# Altium PCB BLE_product-v1.2.PcbDoc (part 1 of 2)
Units mil, origin at the board's own origin, x right, y up, seen from the top; angles counter-clockwise.
Board outline 629.8 x 648.96 mil, 4 copper layers (Top Layer, Layer 2, Layer 3, Bottom Layer), stack 39.334 mil thick; 45 components, 32 nets, 192 pads, 79 vias.
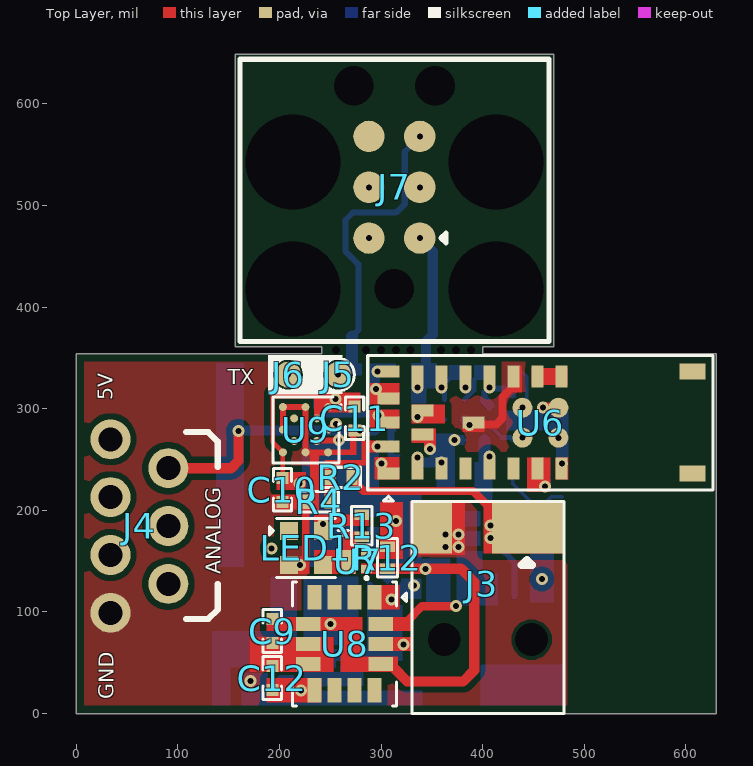
[diagram p0: Top Layer view]
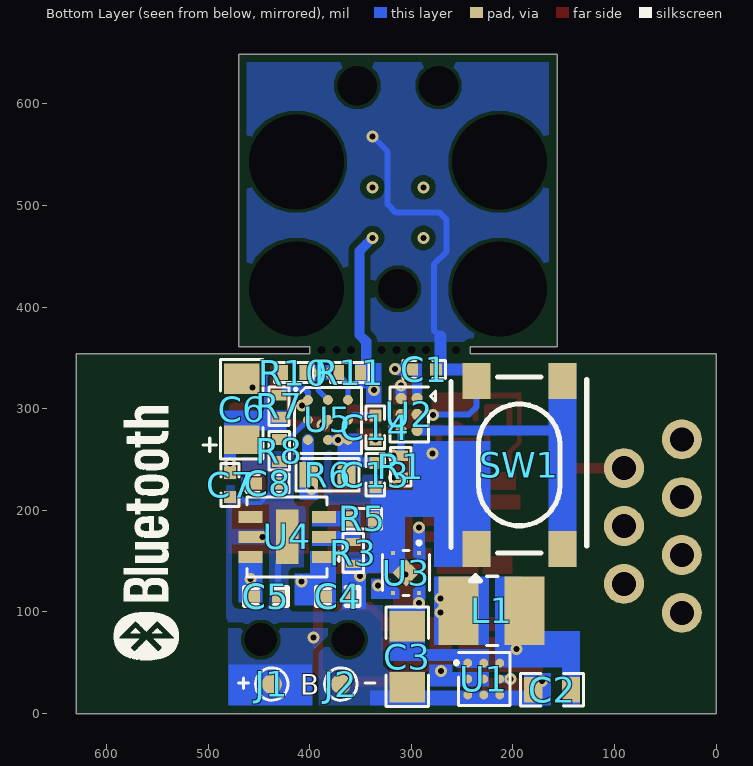
[diagram p1: Bottom Layer view, seen from below]
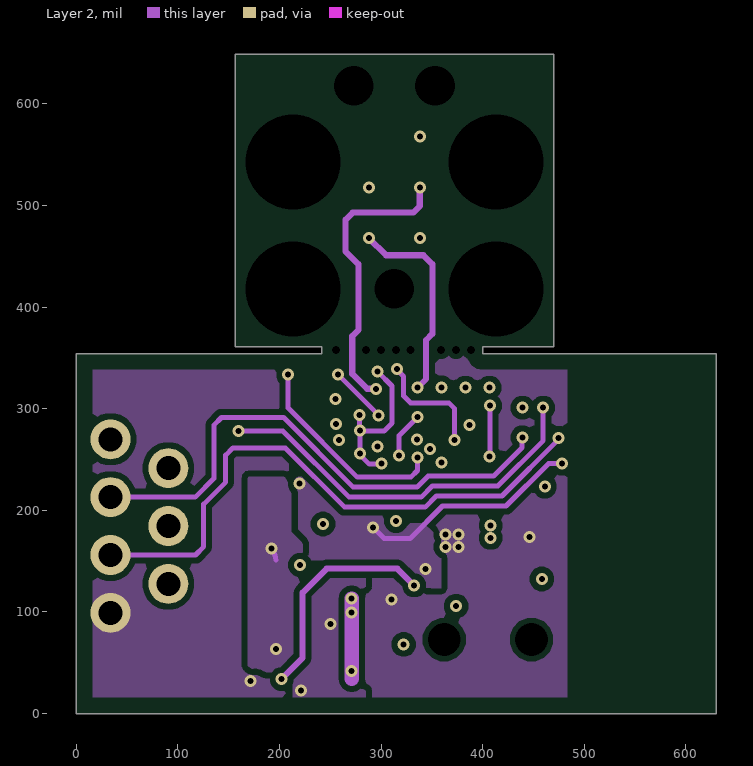
[diagram p2: Layer 2]
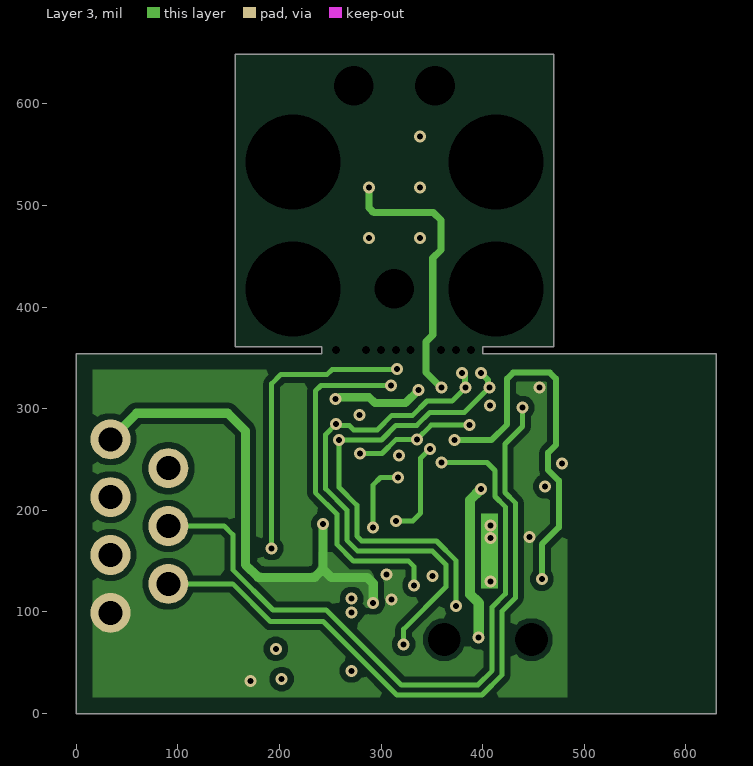
[diagram p3: Layer 3]
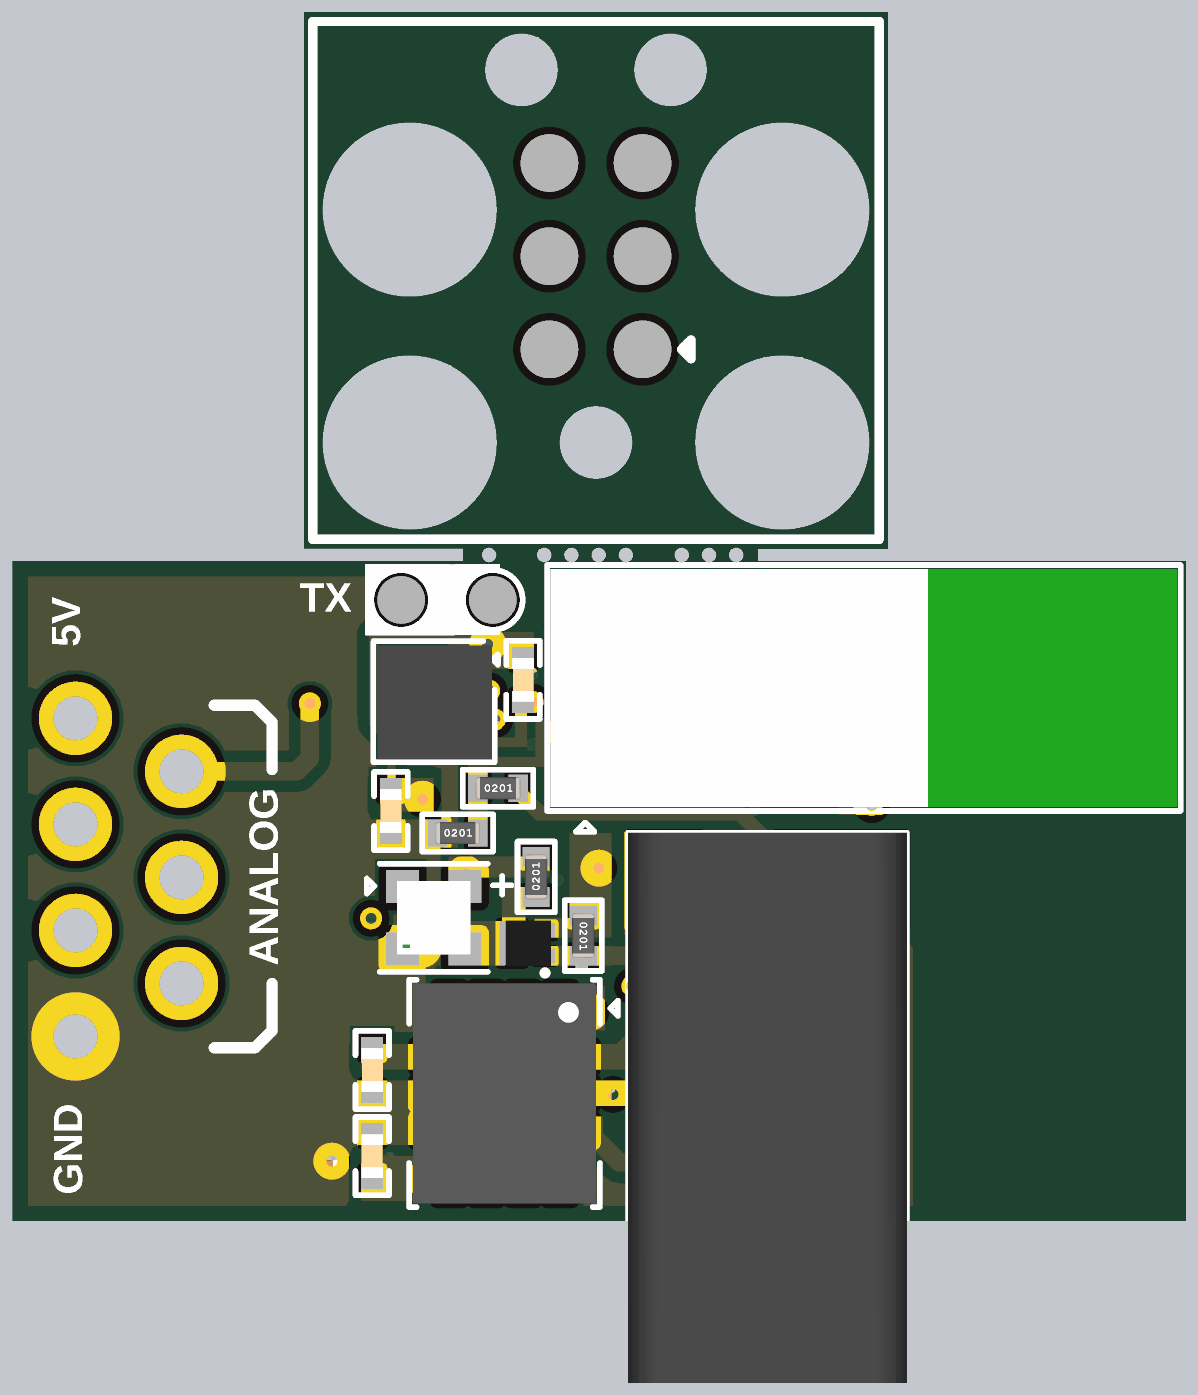
[diagram p4: 3D render of the assembled board from above, using the file's embedded part models]
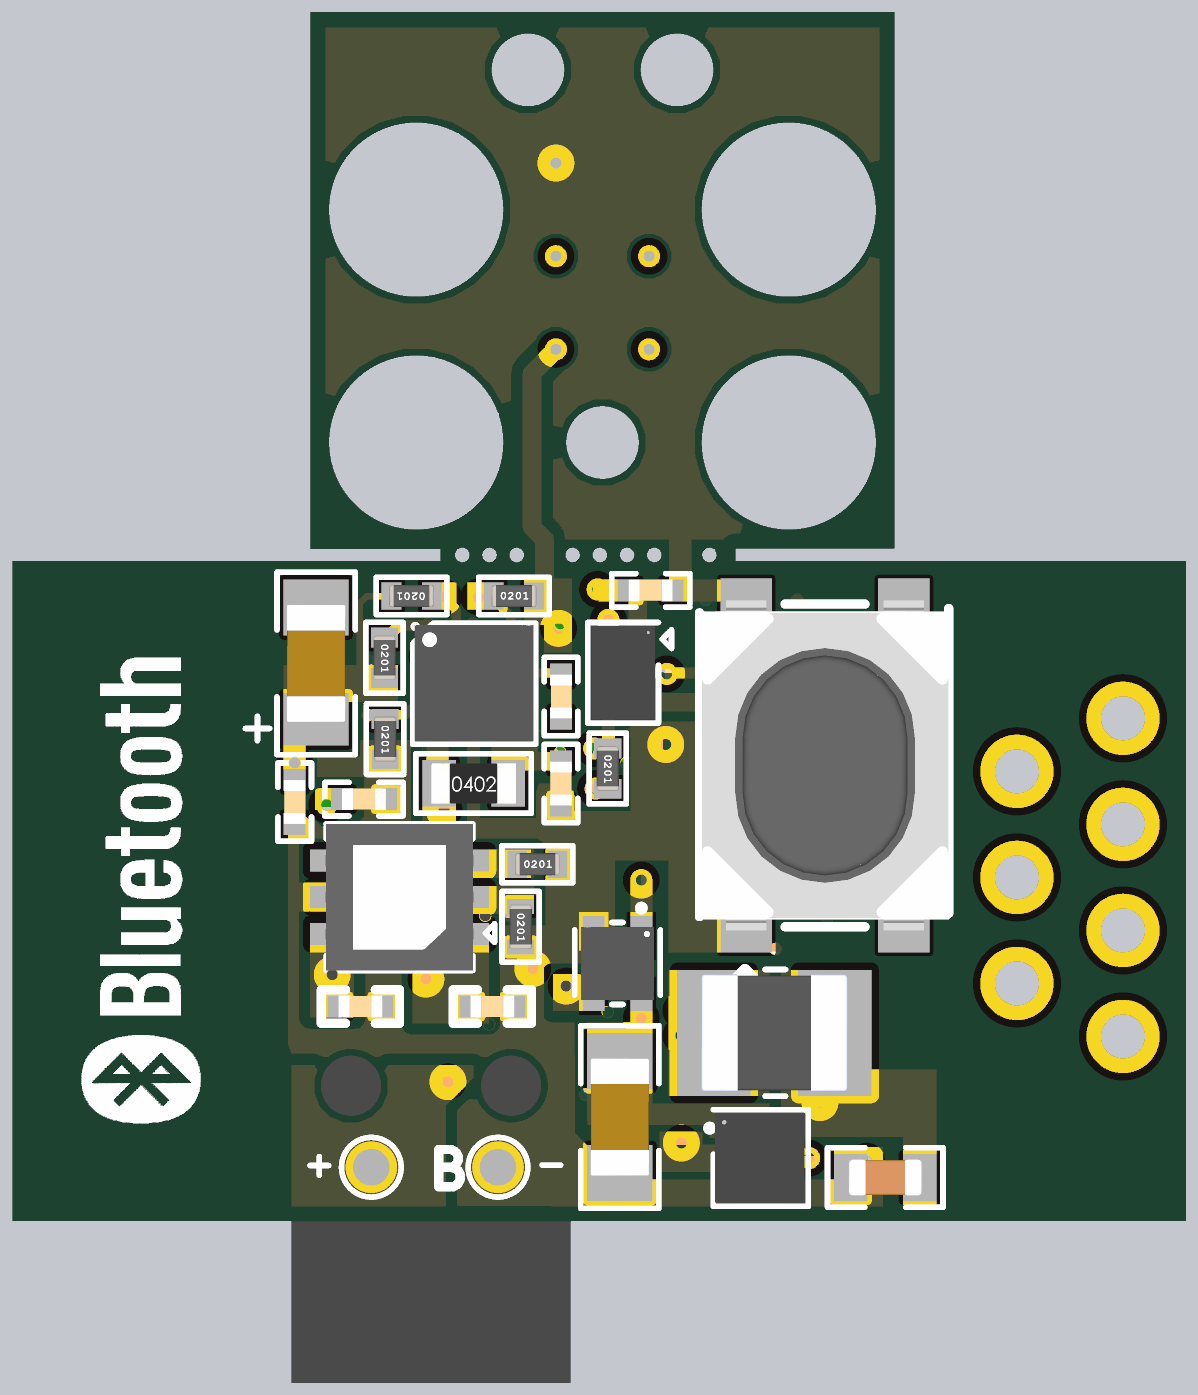
[diagram p5: 3D render of the assembled board from below, using the file's embedded part models]

## Layer stack, top to bottom
Top Solder: solder mask 0.4, Solder Resist, Dk 3.5
Top Layer: signal copper 1.378
Dielectric 2: prepreg 5.1, PP-017, Dk 4.3
Layer 2: signal copper 1.378
Dielectric 1: dielectric 23.622, FR-4, Dk 4.8
Layer 3: signal copper 1.378
Dielectric 3: prepreg 5.1, PP-017, Dk 4.3
Bottom Layer: signal copper 1.378
Bottom Solder: solder mask 0.4, Solder Resist, Dk 3.5

## Board outline
0,0 0,354.33 241.83,354.33 241.83,361 156.45,361 156.45,648.96 469.98,648.96 469.98,360.92 400.1,360.92 400.1,354.33 629.8,354.33 629.8,0

## Design rules (kind name [scope] priority, off if disabled: settings)
BoardOutlineClearance BoardOutlineClearance_OUTER [(OnLayer('Top Layer') OR OnLayer('Bottom Layer'))] p1: gap=8 ignorepadtopadclearanceinfootprint=FALSE
BoardOutlineClearance BoardOutlineClearance_INNER [(OnLayer('Layer 2') OR OnLayer('Layer 3'))] p2: gap=15.75 ignorepadtopadclearanceinfootprint=FALSE except(0: Arc-SplitContinuation Track-SplitContinuation SMDPad-SplitContinuation THPad-SplitContinuation Via-SplitContinuation Fill-SplitContinuation Poly-SplitContinuation Region-SplitContinuation Text-SplitContinuation)
Clearance Clearance_LAYER3 [OnLayer('Layer 3')] p1: gap=4.92 ignorepadtopadclearanceinfootprint=FALSE except(6: Arc-Poly Track-Poly SMDPad-Poly THPad-Poly Via-Poly Fill-Poly Poly-Poly)
Clearance Clearance_LAYER2 [OnLayer('Layer 2')] p2: gap=4.92 ignorepadtopadclearanceinfootprint=FALSE except(6: Arc-Poly Track-Poly SMDPad-Poly THPad-Poly Via-Poly Fill-Poly Poly-Poly)
Clearance Clearance_BOTTOM [OnLayer('Bottom Layer')] p3: gap=3.54 ignorepadtopadclearanceinfootprint=FALSE except(6: Arc-Poly Track-Poly SMDPad-Poly THPad-Poly Via-Poly Fill-Poly Poly-Poly)
Clearance Clearance_TOP [OnLayer('Top Layer')] p4: gap=3.54 ignorepadtopadclearanceinfootprint=FALSE except(6: Arc-Poly Track-Poly SMDPad-Poly THPad-Poly Via-Poly Fill-Poly Poly-Poly)
ComponentClearance [All] p1: gap=0 collisioncheckmode=3 verticalgap=0 showdistances=FALSE
HoleToHoleClearance [All] p1: gap=5 allowstackedmicrovias=TRUE
MinimumSolderMaskSliver [All] p1: minsoldermaskwidth=0
PolygonConnect PolygonConnect_TOP [HasFootprint('TC2030-IDC-NL_')] p1: connectstyle=Relief reliefconductorwidth=5 reliefentries=4 polygonreliefangle="90 Angle" airgapwidth=5
PolygonConnect [All] p2: connectstyle=Direct reliefconductorwidth=4 reliefentries=4 polygonreliefangle="90 Angle" airgapwidth=4
RoutingVias [All] p1: holewidth=5.91 width=11.81 viastyle="Through Hole" minholewidth=5.91 minwidth=11.81 maxholewidth=5.91 maxwidth=11.81
SilkToSilkClearance [All] p1: silktosilkclearance=0
SilkToSolderMaskClearance [IsPad] p1: minsilkscreentomaskgap=0 clearancetoexposedcopper=TRUE
SolderMaskExpansion [All] p1: expansion=4 istentingtop=FALSE
SupplyNets "Schematic Supply Nets_5" [InNet('3V')] p1: voltage=0.000
SupplyNets "Schematic Supply Nets_4" [InNet('VBAT')] p2: voltage=0.000
SupplyNets "Schematic Supply Nets_3" [InNet('GND')] p3: voltage=0.000
SupplyNets "Schematic Supply Nets_2" [InNet('5V')] p4: voltage=0.000
SupplyNets "Schematic Supply Nets_1" [InNet('5V_USB')] p5: voltage=0.000
SupplyNets "Schematic Supply Nets" [InNet('VBAT#')] p6: voltage=0.000
Width [All] p1: maxlimit=15 minlimit=3.54 preferedwidth=5.91 midlayer1_minwidth=4.92 midlayer2_minwidth=4.92 minimp=50.000000 maximp=50.000000 favimp=50.000000
25 further rules are at their usual default settings.

## Classes and differential pairs
component class U_Power_Sheet: C1 C2 C3 C4 C5 C13 C14 J1 J2 J3 L1 R1 R2 R3 R4 R5 R6 R7 R8 SW1 U1 U2 U3 U4 U5
component class U_IMU_Sensor_Sheet: C9 C10 C11 C12 U8 U9
component class U_BLE_Module_Sheet: 2 C6 C7 C8 J4 J5 J6 J7 LED1 R10 R11 R12 R13 U6 U7

## Components (designator, comment, footprint, x,y, rotation, side; value= is the part's Value field where it differs from the comment)
C1 "0.1uF" CAP-0201 287.28,338.65 r0 bottom
C2 "10uF" Cap-0402 161.38,23.51 r180 bottom
C3 "22uF" Cap-0603 303.87,55.93 r90 bottom
C4 "1uF" CAP-0201 372.29,115.26 r0 bottom
C5 "2.2uf" CAP-0201 443.09,115.26 r0 bottom value=2.2uF
C6 "100uF" F980J107MMAAXE 466.88,269.45 r90 bottom
C7 "0.1uF" CAP-0201 478.36,225 r90 bottom
C8 "1uF" CAP-0201 441.21,226.55 r0 bottom
C9 "0.1uF" CAP-0201 193.05,81.19 r90 top
C10 "0.1uF" CAP-0201 203.02,220.2 r90 top
C11 "0.1uF" CAP-0201 274.02,290.58 r90 top
C12 "0.1uF" CAP-0201 193.05,34.98 r270 top
C13 "1uF" CAP-0201 335.4,234.96 r270 bottom
C14 "2.2uF" CAP-0201 335.4,281.63 r90 bottom
J1 "1 Sensor Pad 0.5mm" "1 Sensor Pad 0.5mm"#1 437.25,29 r180 bottom
J2 "1 Sensor Pad 0.5mm" "1 Sensor Pad 0.5mm"#1 369.25,29 r180 bottom
J3 "DC-096" DC-096 399.09,127.87 r270 top
J4 "Sensor Pads 0.5mm Dia" "Sensor-Pads 0.5mm Dia" 33.78,269.95 r270 top
J5 "1 Sensor Pad 0.5mm" "1 Sensor Pad 0.5mm"#2 257.78,333.51 r90 top
J6 "1 Sensor Pad 0.5mm" "1 Sensor Pad 0.5mm"#2 208.56,333.51 r90 top
J7 "TC2030-IDC" TC2030-IDC_ 313.16,518 r90 top
L1 "470nH" IND-0806 220.9,101.14 r180 bottom
LED1 "XL-1010RGBC-WS2812B" XL-1010RGBC-WS2812B 226.06,162.91 r0 top
R1 "10K" Res-0201#1 310.36,243 r270 bottom
R2 "22K" Res-0201#1 260.56,232.4 r0 top
R3 "10K" Res-0201#2 357.09,158.06 r270 bottom
R4 "33k" Res-0201#1 238.9,208.37 r0 top
R5 "10K" Res-0201#1 348.1,191.62 r180 bottom
R6 "10mR" Res-0402 382.36,235 r180 bottom
R7 "5.1K" Res-0201#1 430.17,302.43 r270 bottom value=5.1kR
R8 "10K" Res-0201#1 429.86,258.83 r270 bottom
R10 "4.7K" Res-0201#1 415.65,335.65 r0 bottom
R11 "4.7K" Res-0201#1 360.67,335.65 r180 bottom
R12 "10K" Res-0201#1 306.33,153.32 r270 top
R13 "10K" Res-0201#1 281.02,184.83 r90 top
SW1 "TSA016A2518A" TSA016A2518A 193.7,244.67 r90 bottom
U1 "FAN48610UC50X" "WLCSP-9 (1.22x1.22)" 228.64,33.97 r180 bottom
U2 "MAX16150AWT+" WLP-6(0.83x1.24) 302.11,294.41 r270 bottom locked
U3 "TLV73330PDQNR" X2-SON-4(1x1) 305.14,138.38 r270 bottom
U4 "FAN54120MP420X" DFN-6-EP(2x2) 422.11,173.93 r0 bottom
U5 "BQ27426YZFR" "DSBGA-9 (1.651x1.61)" 382.04,289 r180 bottom locked
U6 "EYSHSNZWZ" EYSHSNZWZ 456.93,286.24 r0 top locked
U7 "NTNS3193NZT5G" X-LLGA-3 276.91,149.32 r90 top
U8 "BMI323" "14-LGA (2.5x3)" 264.07,68.64 r270 top locked
U9 "BMM150" "12-WLCSP (1.56x1.56)" 225.7,279.43 r0 top locked

## Footprints (in the part's own frame and the unit in brackets; to place one, negate y for a bottom-side part, rotate by r counter-clockwise, add the part's x,y. Pads: shape width x height; smd on the part's side, far side on the other; paste and mask are expansions set on the pad)
"1 Sensor Pad 0.5mm"#1 [mm]
  round 0.5 smd: 1(0,0)
  silkscreen extent -0.41,-0.41 0.4,0.41
"1 Sensor Pad 0.5mm"#2 [mm]
  round 0.65 smd: 1(0,0)
  silkscreen extent -0.41,-0.41 0.41,0.4
"12-WLCSP (1.56x1.56)" [mm]
  round 0.2 smd mask+0.05: A1(0.566,0.566) A3(0.566,0) A5(0.566,-0.566) B2(0.283,0.283) B4(0.283,-0.283) C1(0,0.566) C5(0,-0.566) D2(-0.283,0.283) D4(-0.283,-0.283) E1(-0.566,0.566) E3(-0.566,0) E5(-0.566,-0.566)
  silkscreen extent -0.81,-0.84 0.89,0.81, body extent -0.75,-0.81 0.81,0.75, height 0.6
"14-LGA (2.5x3)" [mm]
  rect 0.61x0.35 smd: 1(-1.16,0.75) 2(-1.16,0.25) 3(-1.16,-0.25) 4(-1.16,-0.75) 8(1.16,-0.75) 9(1.16,-0.25) 10(1.16,0.25) 11(1.16,0.75)
  rect 0.35x0.61 smd: 5(-0.5,-0.91) 6(0,-0.91) 7(0.5,-0.91) 12(0.5,0.91) 13(0,0.91) 14(-0.5,0.91)
  silkscreen extent -1.55,-1.3 1.55,1.3, body extent -1.5,-1.25 1.5,1.25, height 0.86
CAP-0201 [mm]
  rect 0.3x0.3 smd mask+0.055: 1(-0.3,0) 2(0.3,0)
  silkscreen extent -0.53,-0.23 0.53,0.23, body extent -0.3,-0.15 0.3,0.15, height 0.28
Cap-0402 [mil]
  rect 18x25 smd mask+2.36: 1(-18.5,0) 2(18.5,0)
  silkscreen extent -31,-16 31,16, body extent -20,-10 20,10, height 19
Cap-0603 [mil]
  rect 30x35 smd mask+2.36: 1(-30,0) 2(30,0)
  silkscreen extent -49,-21 49,21, body extent -32,-16 31,16, height 34
DC-096 [mm]
  rect 1.3x1.8 smd mask+0.05: 1(-1.4,1.154)
  rect 1.3x1 smd mask+0.05: 2(-1.4,-1.246)
  round 0 hole 0.82 unplated mask+0.05: MH(1.4,1.246) MH(1.4,-0.937)
  silkscreen extent -2.05,-1.75 -0.46,2.05, body extent -2.05,-1.75 5.45,2.05, height 3.8
DFN-6-EP(2x2) [mm]
  rect 0.6x0.3 smd: 1(-0.917,0.5) 2(-0.917,0) 3(-0.917,-0.5) 4(0.918,-0.5) 5(0.918,0) 6(0.918,0.5)
  rect 0.56x1.37 smd: 7(0,0)
  silkscreen extent -1,-1 1,1, body extent -1.01,-1 1.01,1, height 0.76
"DSBGA-9 (1.651x1.61)" [mm]
  round 0.245 smd mask+0.05: A1(-0.5,0.5) A2(0,0.5) A3(0.5,0.5) B1(-0.5,0) B2(0,0) B3(0.5,0) C1(-0.5,-0.5) C2(0,-0.5) C3(0.5,-0.5)
  silkscreen extent -0.84,-0.84 0.84,0.81, body extent -0.81,-0.79 0.81,0.79, height 0.63
EYSHSNZWZ [mm]
  rect 0.55x0.3 smd: 1(-3.8,-1.275) 18(-3.8,1.275) 19(-3.8,0.6) 20(-3.8,0) 21(-3.8,-0.6) 22(-2.95,-0.3) 25(-2.95,0.3) 26(-1.675,0)
  rect 0.3x0.55 smd: 2(-3.075,-1.15) 3(-2.475,-1.15) 4(-1.875,-1.15) 5(-1.275,-1.15) 6(-0.675,-1.15) 7(-0.075,-1.15) 8(0.525,-1.15) 11(0.525,1.15) 12(-0.075,1.15) 13(-0.675,1.15) 14(-1.275,1.15) 15(-1.875,1.15) 16(-2.475,1.15) 17(-3.075,1.15)
  round 0.5 smd: 9(0.45,-0.375) 10(0.45,0.375) 23(-0.45,-0.375) 24(-0.45,0.375)
  rect 0.65x0.4 smd: 27(3.8,-1.275) 28(3.8,1.275)
  silkscreen extent -4.32,-1.68 4.32,1.68, body extent -4.28,-1.63 4.28,1.63, height 0.85
F980J107MMAAXE [mil]
  rect 28x35 smd mask+2.36: 1(0,0)
  rect 30x35 smd mask+2.36: 2(60,0)
  silkscreen extent -19,-21 79,21, body extent -2,-16 61,16, height 34
IND-0806 [mm]
  rect 1x1.72 smd: 1(-0.825,0) 2(0.825,0)
  silkscreen extent -0.13,-0.86 0.15,0.86, body extent -1,-0.8 1,0.8, height 1.2
Res-0201#1 [mm]
  rect 0.27x0.37 smd mask+0.055: 1(-0.275,0) 2(0.275,0)
  silkscreen extent -0.48,-0.25 0.48,0.25, body extent -0.3,-0.15 0.3,0.15, height 0.29
Res-0201#2 [mm]
  rect 0.203x0.37 smd mask+0.055: 1(-0.275,0) 2(0.275,0)
  silkscreen extent -0.48,-0.25 0.48,0.25, body extent -0.3,-0.15 0.3,0.15, height 0.29
Res-0402 [mil]
  rect 18x25 smd mask+2.17: 1(-18.5,0) 2(18.5,0)
  silkscreen extent -32,-17 32,16, body extent -23,-11 23,11, height 16
"Sensor-Pads 0.5mm Dia" [mm]
  round 1 hole 0.6: 1(0,0) 2(1.446,0) 3(2.891,0) 4(4.337,0) 5(0.723,1.446) 6(2.168,1.446) 7(3.614,1.446)
TC2030-IDC_ [mm] "CABLE ADAPTER 6 POS"
  round 0.787 smd: 1(-1.27,-0.635) 1(-1.27,-0.635) 2(-1.27,0.635) 3(0,-0.635) 4(0,0.635) 5(1.27,-0.635) 6(1.27,0.635)
  round 0 hole 2.375 unplated: MP1(-2.54,-2.54) MP2(0.635,-2.54) MP3(0.635,2.54) MP4(-2.54,2.54)
  round 0 hole 0.991 unplated: MP5(-2.54,0) MP6(2.54,-1.016) MP7(2.54,1.016)
  silkscreen extent -3.86,-3.86 3.2,3.86
TSA016A2518A [mm]
  rect 0.9x0.7 smd paste+0 mask+0.051: 1(-2.1,1.075) 2(2.1,1.075) 3(-2.1,-1.075) 4(2.1,-1.075)
  silkscreen extent -2.9,-1.69 2.2,1.71, body extent -2.25,-1.7 2.25,1.7, height 2.5
"WLCSP-9 (1.22x1.22)" [mm]
  round 0.218 smd mask+0.055: A1(-0.4,0.4) A2(0,0.4) A3(0.4,0.4) B1(-0.4,0) B2(0,0) B3(0.4,0) C1(-0.4,-0.4) C2(0,-0.4) C3(0.4,-0.4)
  silkscreen extent -0.71,-0.66 0.66,0.66, body extent -0.61,-0.61 0.61,0.61, height 0.59
WLP-6(0.83x1.24) [mm]
  round 0.28 smd mask+0.055: A1(-0.4,0.2) A2(0,0.2) A3(0.4,0.2) B1(-0.4,-0.2) B2(0,-0.2) B3(0.4,-0.2)
  silkscreen extent -0.69,-0.48 0.69,0.66, body extent -0.64,-0.43 0.64,0.43, height 0.69
X2-SON-4(1x1) [mm]
  rect 0.1x0.1 smd paste-1 mask+0: 1(-0.5,0.325) 2(-0.5,-0.325) 3(0.5,-0.325) 4(0.5,0.325)
  rect 0.48x0.48 smd rot 135: 5(0,0)
  Top Layer region: 0.42,0.175 0.22,0.375 0.22,0.475 0.65,0.475 0.65,0.175
  Top Layer region: 0.22,-0.475 0.22,-0.375 0.42,-0.175 0.65,-0.175 0.65,-0.475
  Top Layer region: -0.65,-0.475 -0.65,-0.175 -0.42,-0.175 -0.22,-0.375 -0.22,-0.475
  Top Layer region: -0.42,0.175 -0.65,0.175 -0.65,0.475 -0.12,0.475
  silkscreen extent -0.78,-0.58 0.56,0.58, body extent -0.5,-0.5 0.5,0.5, height 0.58
X-LLGA-3 [mm]
  rect 0.2x0.28 smd mask+0.05: 1(-0.175,-0.222) 2(0.175,-0.222)
  rect 0.6x0.35 smd mask+0.05: 3(0,0.223)
  silkscreen extent -0.43,-0.25 -0.38,-0.2, body extent -0.31,-0.31 0.31,0.31, height 0.29
XL-1010RGBC-WS2812B [mm]
  rect 0.45x0.45 smd: 1(-0.425,0.425) 2(0.425,0.425) 3(-0.425,-0.425) 4(0.425,-0.425)
  silkscreen extent -0.74,-0.74 0.74,0.74, body extent -0.5,-0.5 0.5,0.5, height 0.81

## Part data
C1 C7 C9 C10 C11 C12: library part CC0201KRX5R6BB104, "CAP CER 0.1UF 10V X5R 0201", Capacitance=100nF, Case Code (Imperial)=0201, Case Code (Metric)=0603, Dielectric=X5R, LCSC Part Number=C190183, Manufacturer=Yageo, Max Operating Temperature=85°C, Min Operating Temperature=-55°C, Resistor Type=Ceramic, Supplier Part Number 1=603-CC201KRX5R6BB104, Tolerance=10%, Voltage Rating=10V, Case/Package=0201, Category="Ceramic Capacitors", ComponentLink1Description=https://datasheet.ciiva.com/11587/upy-gphc-x5r-4v-to-50v-12-11587190.pdf?src-supplier=Avnet, ComponentLink1URL=https://datasheet.ciiva.com/11587/upy-gphc-x5r-4v-to-50v-12-11587190.pdf?src-supplier=Avnet, Construction=Flat, Depth=0.3mm, Halogen Free="Halogen Free", Height=0.3mm, Lead Free="Lead Free", Length=0.6mm, Manufacturer Part Number=CC0201KRX5R6BB104, Mount="Surface Mount", Packaging="Tape and Reel", Pricing 1="1=0.10000, 10=0.02400, 50=0.02400, 100=0.01900, 1000=0.01100, 10000=0.00900 (USD)", Radiation Hardening=No, RoHS=Yes, RoHS Compliant=Yes, Series=CC, Stock 1=824403, Supplier 1=Mouser, Termination=SMD/SMT, Thickness=0.013inch, Voltage Rating (DC)=10V, Weight=6E-06oz, Width=0.012inch
C2: library part CL05A106MP5NUNC, "CAP CER 10UF 10V X5R 0402", Case Code (Imperial)=0402, Case Code (Metric)=1005, Dielectric=X5R, LCSC Part Number=C315248, Manufacturer=Samsung, Max Operating Temperature=85°C, Min Operating Temperature=-55°C, Package Quantity=1, Tolerance=20%, Voltage Rating=10V, Capacitance=10uF, Case/Package=0402, Category="Ceramic Capacitors", ComponentLink1Description=https://datasheet.ciiva.com/25721/cl05a106mp5nunc-25721584.pdf?src-supplier=Digi-Key, ComponentLink1URL=https://datasheet.ciiva.com/25721/cl05a106mp5nunc-25721584.pdf?src-supplier=Digi-Key, ComponentLink2Description=https://datasheet.ciiva.com/26838/getdatasheetpartid-745310-26838170.pdf?src-supplier=Verical, ComponentLink2URL=https://datasheet.ciiva.com/26838/getdatasheetpartid-745310-26838170.pdf?src-supplier=Verical, Construction=Flat, Contact Plating=Tin, Depth=0.5mm, Item Type=Capacitor, Lead Free="Lead Free", Length=1mm, Manufacturer Part Number=CL05A106MP5NUNC, Mount="Surface Mount", Packaging="Tape and Reel", Pricing 1="10000=0.02537 (USD)", Radiation Hardening=No, RoHS=Yes, RoHS Compliant=Yes, Series=CL, Stock 1=1729850, Supplier 1=Avnet, Supplier Part Number 1=CL05A106MP5NUNC, Termination=Wraparound, Thickness=0.028inch, Width=0.02inch
C3: library part CC0603MRX5R6BB226, "CAP CER 22UF 10V X5R 0603", Case Code (Imperial)=0603, Case Code (Metric)=1608, Dielectric=X5R, LCSC Part Number=C109447, Manufacturer=Yageo, Max Operating Temperature=85°C, Min Operating Temperature=-55°C, Package Quantity=4000, Supplier Part Number 1=311-1819-1-ND, Tolerance=20%, Voltage Rating=10V, Capacitance=22uF, Case/Package=0603, Category="Ceramic Capacitors", ComponentLink1Description=http://www.mouser.com/ds/2/447/Yageo_UPY-GP_NP0_16V-to-50V_9-358835.pdf?src-supplier=Mouser, ComponentLink1URL=http://www.mouser.com/ds/2/447/Yageo_UPY-GP_NP0_16V-to-50V_9-358835.pdf?src-supplier=Mouser, ComponentLink2Description=http://www.yageo.com/documents/recent/UPY-GPHC_X5R_4V-to-50V_25.pdf?src-supplier=Digi-Key, ComponentLink2URL=http://www.yageo.com/documents/recent/UPY-GPHC_X5R_4V-to-50V_25.pdf?src-supplier=Digi-Key, Halogen Free="Halogen Free", Height=0.8mm, Item Type=Capacitor, Lead Free="Lead Free", Length=0.063inch, Manufacturer Part Number=CC0603MRX5R6BB226, Mount="Surface Mount", Packaging="Tape and Reel", Pricing 1="1=0.68000, 10=0.48000, 50=0.36300, 100=0.31610, 500=0.23416, 1000=0.19903 (USD)", RoHS=Yes, RoHS Compliant=Yes, Stock 1=19628, Supplier 1=Digi-Key, Termination=SMD/SMT, Thickness=0.035inch, Voltage Rating (DC)=10V, Weight=7.1E-05oz, Width=0.8mm
C4: library part CC0201MRX5R6BB105, "CAP CER 1UF 10V X5R 0201", LCSC Part Number=C605210, Manufacturer=Yageo, Supplier Part Number=311-3474-1-ND, Category="Ceramic Capacitors", ComponentLink1Description=https://datasheet.octopart.com/CC0201MRX5R6BB105-Yageo-datasheet-158238148.pdf?src-supplier=Farnell, ComponentLink1URL=https://datasheet.octopart.com/CC0201MRX5R6BB105-Yageo-datasheet-158238148.pdf?src-supplier=Farnell, ComponentLink2Description=http://www.yageo.com/documents/recent/UPY-GPHC_X5R_4V-to-50V_25.pdf?src-supplier=Digi-Key, ComponentLink2URL=http://www.yageo.com/documents/recent/UPY-GPHC_X5R_4V-to-50V_25.pdf?src-supplier=Digi-Key, ComponentLink3Description=https://datasheet.octopart.com/CC0201MRX5R6BB105-Yageo-datasheet-137700082.pdf?src-supplier=Future+Electronics, ComponentLink3URL=https://datasheet.octopart.com/CC0201MRX5R6BB105-Yageo-datasheet-137700082.pdf?src-supplier=Future+Electronics, Item Type=Capacitor, Manufacturer Part Number=CC0201MRX5R6BB105, Pricing="1=0.19, 10=0.135, 50=0.0764, 100=0.0633, 500=0.04436, 1000=0.03672, 2500=0.03418, 5000=0.03127 (USD)", RoHS=Yes, Stock=772400, Supplier=Digi-Key
C5 C14: library part CC0201MRX5R6BB225, "CAP CER 2.2UF 10V X5R 0201", Case/Package=0201, LCSC Part Number=C2186869, Manufacturer=Yageo, Max Operating Temperature=85°C, Min Operating Temperature=-55°C, Supplier Part Number=603-CC0201MRX56BB225, Tolerance=20%, Voltage Rating=10V, Category="Ceramic Capacitors", ComponentLink1Description=https://www.yageo.com/upload/media/product/productsearch/datasheet/mlcc/UPY-GPHC_X5R_4V-to-50V_26.pdf?src-supplier=Digi-Key, ComponentLink1URL=https://www.yageo.com/upload/media/product/productsearch/datasheet/mlcc/UPY-GPHC_X5R_4V-to-50V_26.pdf?src-supplier=Digi-Key, Item Type=Capacitor, Manufacturer Part Number=CC0201MRX5R6BB225, Mounting Technology="Surface Mount", Packaging="Tape and Reel", Pricing="1=0.43, 10=0.294, 50=0.294, 100=0.176, 1000=0.112, 10000=0.091 (USD)", RoHS=Yes, RoHS Compliant=Yes, Series=CC, Stock=25553, Supplier=Mouser
C6: library part F980J107MMAAXE, "CAP TANT 100UF 20% 6.3V 0603", LCSC Part Number=C1955164, Manufacturer="Kyocera AVX", Supplier Part Number=478-9836-1-ND, Category="Tantalum Capacitors", ComponentLink1Description=http://www.farnell.com/datasheets/2602422.pdf?src-supplier=Farnell, ComponentLink1URL=http://www.farnell.com/datasheets/2602422.pdf?src-supplier=Farnell, ComponentLink2Description=https://datasheet.octopart.com/F980J107MMAAXE-AVX-datasheet-104407997.pdf?src-supplier=Newark, ComponentLink2URL=https://datasheet.octopart.com/F980J107MMAAXE-AVX-datasheet-104407997.pdf?src-supplier=Newark, ComponentLink3Description=https://datasheet.octopart.com/F980J107MMAAXE-KYOCERA-AVX-datasheet-57254939.pdf?src-supplier=Future+Electronics, ComponentLink3URL=https://datasheet.octopart.com/F980J107MMAAXE-KYOCERA-AVX-datasheet-57254939.pdf?src-supplier=Future+Electronics, ComponentLink4Description=http://datasheets.avx.com/F98.pdf?src-supplier=Digi-Key, ComponentLink4URL=http://datasheets.avx.com/F98.pdf?src-supplier=Digi-Key, ComponentLink5Description=http://www.farnell.com/datasheets/2649022.pdf?src-supplier=Newark, ComponentLink5URL=http://www.farnell.com/datasheets/2649022.pdf?src-supplier=Newark, Item Type=Capacitor, Manufacturer Part Number=F980J107MMAAXE, Pricing="1=0.71, 10=0.505, 50=0.382, 100=0.3327, 500=0.24644, 1000=0.20947 (USD)", RoHS=Yes, Stock=133089, Supplier=Digi-Key
C8 C13: library part CC0201MRX5R7BB105, "CAP CER 1UF 16V X5R 0201", LCSC Part Number=C5182464, Manufacturer=Yageo, Supplier Part Number=13-CC0201MRX5R7BB105TR-ND, Category="Ceramic Capacitors", Item Type=Capacitor, Manufacturer Part Number=CC0201MRX5R7BB105, RoHS=Yes, Supplier=Digi-Key
J1 J2 J5 J6: "Wire Connecting Pad 0.5mm", Item Type="SMD Pad", Manufacturer Part Number="1 Sensor Pad 0.5mm"
J3: "DC Power Jack Socket Female Panel Mount Connector", Manufacturer="CW Switch Elec. Store", Item Type="DC Jack Female", Manufacturer Part Number=DC-096
J4: "Wire Connecting Pad", Manufacturer Part Number="Sensor Pads", Item Type="SMD Pads"
J7: "CABLE ADAPTER 6 POS", Manufacturer=Tag-Connect, Package Quantity=1, Supplier Part Number 1=TC2030-IDC-ND, ComponentLink1Description=http://www.tag-connect.com/Materials/TC2030-MCP%20Datasheet.pdf?src-supplier=Digi-Key, ComponentLink1URL=http://www.tag-connect.com/Materials/TC2030-MCP%20Datasheet.pdf?src-supplier=Digi-Key, Manufacturer Part Number=TC2030-IDC, Pricing 1="1=43.71 (USD)", Stock 1=284, Supplier 1=Digi-Key
L1: library part 1286AS-H-R47M=P2, "FIXED IND 470NH 3.4A 52 MOHM SMD", Case Code (Imperial)=0806, Case Code (Metric)=2016, Current Rating=3.4A, DC Resistance (DCR)=52mR, LCSC Part Number=C160957, Manufacturer=Murata, Manufacturer Part Number=1286AS-H-R47M=P2, Max DC Current=3.8A, Max Operating Temperature=85°C, Min Operating Temperature=-40°C, Supplier Part Number=490-10606-1-ND, Test Frequency=1MHz, Tolerance=20%, Case/Package=0806, Category="Fixed Inductors", ComponentLink1Description=http://www.farnell.com/datasheets/2021974.pdf?src-supplier=Farnell, ComponentLink1URL=http://www.farnell.com/datasheets/2021974.pdf?src-supplier=Farnell, ComponentLink2Description=http://www.toko.co.jp/products/pdf/inductors/dfe201612c.pdf?src-supplier=Avnet, ComponentLink2URL=http://www.toko.co.jp/products/pdf/inductors/dfe201612c.pdf?src-supplier=Avnet, ComponentLink3Description=http://search.murata.co.jp/Ceramy/image/img/P02/J(E)TE243A-0010_DFE201612C_reference.pdf?src-supplier=Digi-Key, ComponentLink3URL=http://search.murata.co.jp/Ceramy/image/img/P02/J(E)TE243A-0010_DFE201612C_reference.pdf?src-supplier=Digi-Key, ComponentLink4Description=http://www.toko.co.jp/products/pdf/inductors/dfe201612c.pdf?src-supplier=Digi-Key, ComponentLink4URL=http://www.toko.co.jp/products/pdf/inductors/dfe201612c.pdf?src-supplier=Digi-Key, Core Material=Ferrite, Depth=1.6mm, Height - Seated (Max)=0.047inch, Item Type=Inductor, Length=0.079inch, Mounting Technology="Surface Mount", Packaging="Cut Tape", Pricing="1=0.39, 10=0.348, 25=0.3048, 50=0.2612, 100=0.2394, 250=0.21764, 500=0.2046, 1000=0.15671 (USD)", RoHS=Yes, RoHS Compliant=Yes, Series=DFE201612C, Shielding=Shielded, Stock=12493, Supplier=Digi-Key, Width=0.063inch
LED1: "Colorless transparence -40℃~+150℃ 正贴 RGB 120° 1010 Light Emitting Diodes (LED) ROHS", LCSC Part Number=C5349953, Manufacturer=XINGLIGHT, Package=1010, ComponentLink1Description=LCSC, ComponentLink1URL=https://www.lcsc.com/product-detail/Light-Emitting-Diodes-LED_XINGLIGHT-XL-1010RGBC-WS2812B_C5349953.html, Item Type="RGB LED", Manufacturer Part Number=XL-1010RGBC-WS2812B
R1 R3 R5 R8 R12 R13: library part RC0201JR-0710KL, "RES SMD 10K OHM 5% 1/20W 0201", Case Code (Imperial)=0201, Case Code (Metric)=0603, LCSC Part Number=C138117, Manufacturer=Yageo, Max Operating Temperature=125°C, Min Operating Temperature=-55°C, Power Rating=50mW, Resistance=10kR, Resistor Type="Thick Film", Supplier Part Number 1=311-10KNCT-ND, Temperature Coefficient=200ppm/°C, Tolerance=5%, Voltage Rating=25V, Case/Package=0201, Category="Chip SMD Resistors", ComponentLink1Description="New link", ComponentLink2Description=https://datasheet.ciiva.com/8891/pyu-rc0201-51-rohs-l-8-8891388.pdf?src-supplier=Avnet, ComponentLink2URL=https://datasheet.ciiva.com/8891/pyu-rc0201-51-rohs-l-8-8891388.pdf?src-supplier=Avnet, ComponentLink3Description=https://datasheet.ciiva.com/7672/1563626-7672253.pdf?src-supplier=Element14, ComponentLink3URL=https://datasheet.ciiva.com/7672/1563626-7672253.pdf?src-supplier=Element14, ComponentLink4Description=https://datasheet.ciiva.com/28405/pyu-rc0201-51-rohs-l-8-28405613.pdf?src-supplier=Avnet+Europe, ComponentLink4URL=https://datasheet.ciiva.com/28405/pyu-rc0201-51-rohs-l-8-28405613.pdf?src-supplier=Avnet+Europe, ComponentLink5Description=https://datasheet.ciiva.com/7672/1563626-7672254.pdf?src-supplier=Element14, ComponentLink5URL=https://datasheet.ciiva.com/7672/1563626-7672254.pdf?src-supplier=Element14, ComponentLink6Description=https://datasheet.ciiva.com/7660/1421516-7660810.pdf?src-supplier=Element14, ComponentLink6URL=https://datasheet.ciiva.com/7660/1421516-7660810.pdf?src-supplier=Element14, ComponentLink7Description=https://datasheet.ciiva.com/16856/pyu-rc0201-51-rohs-l-8-16856011.pdf?src-supplier=Avnet+Europe, ComponentLink7URL=https://datasheet.ciiva.com/16856/pyu-rc0201-51-rohs-l-8-16856011.pdf?src-supplier=Avnet+Europe, ComponentLink8Description=https://datasheet.ciiva.com/46391/1421516-46391291.pdf?src-supplier=Element14, ComponentLink8URL=https://datasheet.ciiva.com/46391/1421516-46391291.pdf?src-supplier=Element14, Contact Plating=Tin,Matte, Depth=0.3mm, Lead Free="Lead Free", Length=0.6mm, Manufacturer Part Number=RC0201JR-0710KL, Military Standard=Not, Packaging="Tape and Reel", Pricing 1="1=0.10000, 10=0.02600, 100=0.01050, 1000=0.00472, 2500=0.00410, 5000=0.00338 (USD)", Radiation Hardening=No, REACH SVHC=Unknown, RoHS=Yes, Stock 1=1488597, Supplier 1=Digi-Key, Termination=SMD/SMT, Voltage Rating (DC)=25V
R2: library part 0201WMF2202TEE, "50mW Thick Film Resistors ±1% ±200ppm/℃ 22kΩ 0201 Chip Resistor - Surface Mount ROHS", LCSC Part Number=C473469, Manufacturer=UNI-ROYAL, Package=0201, ComponentLink1Description=LCSC, ComponentLink1URL=https://www.lcsc.com/product-detail/Chip-Resistor-Surface-Mount_UNI-ROYAL-Uniroyal-Elec-0201WMF2202TEE_C473469.html, Item Type=Resistor, Manufacturer Part Number=0201WMF2202TEE
R4: library part 0201WMF3302TEE, "50mW Thick Film Resistors ±1% ±200ppm/℃ 33kΩ 0201 Chip Resistor - Surface Mount ROHS", LCSC Part Number=C473534, Manufacturer=UNI-ROYAL, Package=0201, ComponentLink1Description=LCSC, ComponentLink1URL=https://www.lcsc.com/product-detail/Chip-Resistor-Surface-Mount_UNI-ROYAL-Uniroyal-Elec-0201WMF3302TEE_C473534.html, Item Type=Resistor, Manufacturer Part Number=0201WMF3302TEE
R6: library part PE0402FRF470R01L, "RES 0.01 OHM 1% 1/4W 0402", Case/Package=0402, LCSC Part Number=C851613, Manufacturer=Yageo, Max Operating Temperature=125°C, Max Power Dissipation=250mW, Min Operating Temperature=-55°C, Package Quantity=10000, Supplier Part Number=13-PE0402FRF470R01LDKR-ND, Temperature Coefficient=100ppm/°C, Tolerance=1%, Category="Chip SMD Resistors", ComponentLink1Description=http://www.mouser.com/ds/2/447/PYu-PE_521_RoHS_L_3-771548.pdf?src-supplier=Mouser, ComponentLink1URL=http://www.mouser.com/ds/2/447/PYu-PE_521_RoHS_L_3-771548.pdf?src-supplier=Mouser, ComponentLink2Description=http://www.yageo.com/documents/recent/PYu-PE_521_RoHS_L_5.pdf?src-supplier=Digikey, ComponentLink2URL=http://www.yageo.com/documents/recent/PYu-PE_521_RoHS_L_5.pdf?src-supplier=Digikey, Features="Moisture Resistant,Automotive AEC-Q200", Height=0.02inch, Item Type=Resistor, Length=0.039inch, Manufacturer Part Number=PE0402FRF470R01L, Number of Terminations=2, Packaging="Tape and Reel", Pricing="1=0.87, 10=0.719, 25=0.666, 50=0.6086, 100=0.5006, 250=0.45928, 500=0.3812, 1000=0.31002, 5000=0.29578 (USD)", RoHS=Yes, Series=PE, Supplier=Digikey, Width=0.02inch
R7: library part RC0201FR-075K1L, "RES 5.1K OHM 1% 1/20W 0201", Case Code (Imperial)=0201, Case Code (Metric)=0603, LCSC Part Number=C274341, Manufacturer=Yageo, Max Operating Temperature=125°C, Max Power Dissipation=50mW, Min Operating Temperature=-55°C, Supplier Part Number=9072847, Temperature Coefficient=200ppm/°C, Tolerance=1%, Voltage Rating=25V, Case/Package=0201, Category="Chip SMD Resistors", ComponentLink1Description=http://www.mouser.com/ds/2/447/RC0201-559633.pdf?src-supplier=Mouser, ComponentLink1URL=http://www.mouser.com/ds/2/447/RC0201-559633.pdf?src-supplier=Mouser, ComponentLink2Description=https://datasheet.octopart.com/RC0201FR-075K1L-Yageo-datasheet-164759695.pdf?src-supplier=Future+Electronics, ComponentLink2URL=https://datasheet.octopart.com/RC0201FR-075K1L-Yageo-datasheet-164759695.pdf?src-supplier=Future+Electronics, ComponentLink3Description=http://www.yageo.com/documents/recent/PYu-RC_Group_51_RoHS_L_10.pdf?src-supplier=Digi-Key, ComponentLink3URL=http://www.yageo.com/documents/recent/PYu-RC_Group_51_RoHS_L_10.pdf?src-supplier=Digi-Key, Features="Moisture Resistant", Height=0.23mm, Item Type=Resistor, Lead Free="Lead Free", Length=0.6mm, Manufacturer Part Number=RC0201FR-075K1L, Number of Terminations=2, Packaging="Tape and Reel", Power Rating=50mW, Pricing="10000=0.0014, 40000=0.0013, 200000=0.0013, 400000=0.0012, 1250000=0.0011 (USD)", RoHS=Yes, RoHS Compliant=Yes, Series=RC, Stock=280000, Supplier="Future Electronics", Termination=SMD/SMT, Width=0.3mm
R10 R11: library part RC0201FR-074K7L, "RES 4.7K OHM 1% 1/20W 0201", LCSC Part Number=C138135, Manufacturer=Yageo, Supplier Part Number=7537285, Category="Chip SMD Resistors", ComponentLink1Description=https://datasheet.ciiva.com/2493/pyu-r-int-thick-7-2493811.pdf?src-supplier=Digi-Key, ComponentLink1URL=https://datasheet.ciiva.com/2493/pyu-r-int-thick-7-2493811.pdf?src-supplier=Digi-Key, ComponentLink2Description=https://datasheet.ciiva.com/2493/pyu-r-int-thick-7-2493812.pdf?src-supplier=Digi-Key, ComponentLink2URL=https://datasheet.ciiva.com/2493/pyu-r-int-thick-7-2493812.pdf?src-supplier=Digi-Key, ComponentLink3Description=https://datasheet.ciiva.com/2493/pyu-r-int-thick-7-2493813.pdf?src-supplier=Digi-Key, ComponentLink3URL=https://datasheet.ciiva.com/2493/pyu-r-int-thick-7-2493813.pdf?src-supplier=Digi-Key, ComponentLink4Description=https://datasheet.ciiva.com/8892/pyu-rc0201-51-rohs-l-8-8892942.pdf?src-supplier=Avnet, ComponentLink4URL=https://datasheet.ciiva.com/8892/pyu-rc0201-51-rohs-l-8-8892942.pdf?src-supplier=Avnet, ComponentLink5Description=https://datasheet.ciiva.com/7672/1563626-7672233.pdf?src-supplier=Element14, ComponentLink5URL=https://datasheet.ciiva.com/7672/1563626-7672233.pdf?src-supplier=Element14, Item Type=Resistor, Manufacturer Part Number=RC0201FR-074K7L, Pricing="10000=0.0014, 50000=0.0013, 250000=0.0013, 750000=0.0012, 2000000=0.0011 (USD)", RoHS=Yes, Stock=1610000, Supplier="Future Electronics"
SW1: "3.35mm 2.5mm Oval button 50mA Brick nogging 4.2mm 180gf 12V SMD Tactile Switches ROHS", LCSC Part Number=C2888427, Manufacturer=BZCN, Package=SMD, ComponentLink1Description=LCSC, ComponentLink1URL=https://jlcpcb.com/partdetail/Bzcn-TSA016A2518A/C2888427, Item Type="Tactile Switch", Manufacturer Part Number=TSA016A2518A
U1: "IC REG BOOST 5V 1A 9WLCSP", LCSC Part Number=C890712, Manufacturer="ON Semiconductor / Fairchild", ComponentLink1Description=https://datasheet.ciiva.com/29732/fan48610-29732973.pdf?src-supplier=Digi-Key, ComponentLink1URL=https://datasheet.ciiva.com/29732/fan48610-29732973.pdf?src-supplier=Digi-Key, ComponentLink2Description=https://datasheet.ciiva.com/29732/fan48610-29732983.pdf?src-supplier=Digi-Key, ComponentLink2URL=https://datasheet.ciiva.com/29732/fan48610-29732983.pdf?src-supplier=Digi-Key, ComponentLink3Description=https://datasheet.ciiva.com/30018/fan48610-30018312.pdf?src-supplier=Avnet, ComponentLink3URL=https://datasheet.ciiva.com/30018/fan48610-30018312.pdf?src-supplier=Avnet, Item Type=IC, Manufacturer Part Number=FAN48610UC50X, Pricing="893=0.4144, 900=0.4032, 1800=0.392, 4500=0.3808, 9000=0.3696, 45000=0.3584, 90000=0.3472 (USD)", RoHS=Yes, Stock=1164000, Supplier=Avnet, Supplier Part Number=FAN48610UC50X
U2: "IC SUPERVISOR 1 CHANNEL 6WLP", LCSC Part Number=C1019998, Manufacturer="Analog Devices", Supplier Part Number=700-MAX16150AWT+, Category="Voltage Supervisors", Item Type=IC, Manufacturer Part Number=MAX16150AWT+, Pricing="1=3.1, 10=2.78, 50=2.63, 100=2.28, 1000=1.75, 10000=1.69 (USD)", RoHS=No, Stock=13, Supplier=Mouser
U3: "IC REG LINEAR 3V 300MA 4X2SON", LCSC Part Number=C2870830, Manufacturer="Texas Instruments", Supplier Part Number=595-TLV73330PDQNR, Category="Voltage Regulators - Linear", ComponentLink1Description=http://www.ti.com/general/docs/suppproductinfo.tsp?distId=10&amp;gotoUrl=http%3A%2F%2Fwww.ti.com%2Flit%2Fgpn%2Ftlv733p&src-supplier=Digi-Key, ComponentLink1URL=http://www.ti.com/general/docs/suppproductinfo.tsp?distId=10&amp;gotoUrl=http%3A%2F%2Fwww.ti.com%2Flit%2Fgpn%2Ftlv733p&src-supplier=Digi-Key, Item Type=IC, Manufacturer Part Number=TLV73330PDQNR, Pricing="1=0.39, 10=0.255, 50=0.255, 100=0.137, 1000=0.084, 10000=0.058 (USD)", RoHS=Yes, Stock=14746, Supplier=Mouser
U4: "500Ma Usb Compatible Single Cell Li-Ion Linear Charger With Float Voltage Of 4.2V / Reel", Battery Pack Voltage=4.5V, Case/Package=DFN, LCSC Part Number=C890816, Manufacturer="ON Semiconductor", Max Charge Current=500mA, Max Operating Temperature=85°C, Max Supply Voltage=6V, Min Operating Temperature=-30°C, ComponentLink1Description=LCSC, ComponentLink1URL=https://www.lcsc.com/product-detail/Battery-Management-ICs_onsemi-FAN54120MP420X_C890816.html, Fault Protection="Over Current,Over Voltage,Short Circuit", Interface=USB, Item Type=IC, Manufacturer Part Number=FAN54120MP420X, Mounting Technology="Surface Mount", Number of Cells=1, Pricing="3000=0.9606, 6000=0.9252, 12000=0.8029, 15000=0.7598, 24000=0.7093, 30000=0.6852 (USD)", RoHS=Yes, RoHS Compliant=Yes, Series=-, Stock=3000, Supplier="Arrow Electronics", Supplier Part Number=FAN54120MP420X
U5: "IC FUEL GAUGE LI-ION 1CL 9DSBGA", LCSC Part Number=C165137, Manufacturer="Texas Instruments", Supplier Part Number=595-BQ27426YZFR, Category="Battery Management", ComponentLink1Description=http://www.ti.com/lit/pdf/sluubb0?src-supplier=Digikey, ComponentLink1URL=http://www.ti.com/lit/pdf/sluubb0?src-supplier=Digikey, ComponentLink2Description=http://www.ti.com/lit/gpn/bq27426?src-supplier=Mouser, ComponentLink2URL=http://www.ti.com/lit/gpn/bq27426?src-supplier=Mouser, Item Type=IC, Manufacturer Part Number=BQ27426YZFR, Pricing="1=1.63, 10=1.47, 50=1.47, 100=1.18, 1000=0.877, 10000=0.694 (USD)", RoHS=Yes, Stock=3166, Supplier=Mouser
U6: "RF TXRX MODULE BT TRACE ANT SMD", Case/Package=Module, Current - Receiving=11.7mA, Current - Transmitting=16mA, Frequency=2.4GHz, Manufacturer="Taiyo Yuden", Max Operating Temperature=85°C, Min Operating Temperature=-40°C, Supplier Part Number=2889504, Category="RF Receivers, Transceivers", ComponentLink1Description=http://www.yuden.co.jp/to/b0060?src-supplier=Digi-Key, ComponentLink1URL=http://www.yuden.co.jp/to/b0060?src-supplier=Digi-Key, Data Rate=1Mbps, Interface=UART, Manufacturer Part Number=EYSHSNZWZ, Memory Size=64KB, Mounting Technology="Surface Mount", Packaging="Cut Tape", Pricing="1=14.18, 10=11.82 (GBP)", RoHS=Yes, RoHS Compliant=Yes, Sensitivity=-94dBm, Series=EYSHSN, Supplier=Farnell
U7: "MOSFET N-CH 20V 224MA 3XLLGA", LCSC Part Number=C179628, Manufacturer="ON Semiconductor", Category=MOSFETs, ComponentLink1Description=https://datasheet.ciiva.com/24010/ntns3193nz-d-260351-24010388.pdf?src-supplier=Mouser, ComponentLink1URL=https://datasheet.ciiva.com/24010/ntns3193nz-d-260351-24010388.pdf?src-supplier=Mouser, ComponentLink2Description=https://datasheet.ciiva.com/30022/ntns3193nz-d-30022416.pdf?src-supplier=Avnet, ComponentLink2URL=https://datasheet.ciiva.com/30022/ntns3193nz-d-30022416.pdf?src-supplier=Avnet, Item Type=IC, Manufacturer Part Number=NTNS3193NZT5G, Pricing="1405=0.26344, 1500=0.25632, 2900=0.2492, 7100=0.24208, 15000=0.23496, 71000=0.22784, 150000=0.22072 (USD)", RoHS=Yes, Stock=720374, Supplier=Avnet, Supplier Part Number=NTNS3193NZT5G
U8: "IMU ACCEL/GYRO I2C/SPI 14LGA", LCSC Part Number=C5368700, Manufacturer="Bosch Sensortec", Supplier Part Number=1168362, Category=Uncategorized, Item Type=IC, Manufacturer Part Number=BMI323, RoHS=No, Supplier="Future Electronics"
U9: "SENSOR FLIPCORE/HALL SPI 12WLCSP", LCSC Part Number=C171681, Manufacturer="Bosch Sensortec", Supplier Part Number=2457371, Category="Magnetic Sensors", ComponentLink1Description=https://datasheet.ciiva.com/18575/bst-bmm150-ds001-01-18575453.pdf?src-supplier=Digi-Key, ComponentLink1URL=https://datasheet.ciiva.com/18575/bst-bmm150-ds001-01-18575453.pdf?src-supplier=Digi-Key, Item Type=IC, Manufacturer Part Number=BMM150, Pricing="5=1.686, 25=1.598, 100=1.49, 500=1.37, 1000=1.262 (GBP)", RoHS=Yes, Stock=780, Supplier=Rs

## Free pads (board coordinates)
  round 0 hole 7.87 unplated: 1(255.75,357.63) 1(285.36,357.63) 1(299.97,357.63) 1(314.58,357.63) 1(329.2,357.63) 1(359.19,357.63) 1(373.81,357.63) 1(388.42,357.63)

## Via types
v1: diameter 11.81, hole 5.91, Top Layer to Layer 2, 25 vias
v2: diameter 11.81, hole 5.91, Top Layer to Layer 3, 17 vias
v3: diameter 11.81, hole 5.91, Layer 2 to Bottom Layer, 13 vias
v4: diameter 11.81, hole 5.91, Top Layer to Bottom Layer, 12 vias
v5: diameter 11.81, hole 5.91, Layer 3 to Bottom Layer, 12 vias

## Nets (pads, with @x,y where several pads share a name; then routed paths per layer and width w, separated by ;. In a path a pad name is that pad's centre, name@x,y a point inside that pad or via, vN(x,y) a via of type N, cw(c..) or ccw(c..) an arc to the next point about the centre after c; other vN are vias at no path point)
3V: C6.1 C7.2 C9.2 C10.2 C11.2 C12.2 J7.1 R1.2 R7.2 R10.2 R11.2 R12.2 U3.1 U6.8 U7.1 U8.5 U8.8 U8.12 U9.A1 U9.B2 U9.E5 | length 961.1
  Top Layer w3.54: C10.2@203.42,235.6 C10.2@207.02,232.01
  Top Layer w4.5: 193.54,294.3 193.54,267.03 U9.E5 C10.2@203.42,235.6
  Top Layer w5.91: U9.B2 236.84,310.95 237.33,311.43
  Top Layer w10: U8.12 308.83,48.95 311.9,45.88 311.9,45.51 325.81,31.6 380.86,31.6 391.77,42.51 391.77,129.53 378.82,142.49 v1(343.87,142.49) R12.2 R12.2@300.88,142.49
  Layer 2 w4.92: v3(292.34,183.16) 303.18,172.32 328.63,172.32 360.55,204.23 423.08,204.23 464.84,246 v4(478.36,246)
  Layer 3 w4.92: v3(292.34,183.16) 292.34,225.09 299.5,232.25 v5(316.85,232.25)
  Layer 3 w8: v2(255.05,309.67) 255.77,310.4 258.47,310.4 259.4,311.33 288.08,311.33 293.93,305.49 323.96,305.49 v5(336.73,318.25)
  Bottom Layer w3.54: R10.2 426.54,335.58 439.45,335.58 443.37,331.66 443.37,297.76 437.45,291.84 437.45,291.61
  Bottom Layer w10: v4(338.16,468) 350.97,455.19 350.97,372.67 344.3,366 344.3,332.52
  other v1: 221.23,22.75 250.23,88.32 220.02,226.55
5V: C3.2 J4.1 LED1.2 R13.2 U1.A1 U1.A2 U3.4 | length 502.7
  Top Layer w4: LED1.2 242.95,179.8 v2(242.95,186.54) v2@242.95,190.54
  Layer 3 w9: J4.1 59.47,295.64 149.14,295.64 166.57,278.21 166.57,146.62 179.14,134.04 234.84,134.04 242.95,142.15 ; v2(242.95,186.54) 242.95,142.15 ; v5@292.34,109 292.34,128.05 286.48,133.91 251.2,133.91 242.95,142.15
  Bottom Layer w4: v5@292.34,112.79 U3.4
  other v5: 292.34,108.93
5V_USB: C4.2 J3.1 R2.2 U4.1 | length 149.2
  Top Layer w8: R2.2 272.7,231.09 272.7,229.12 282.77,219.05 390.36,219.05 405.18,204.23 407.76,204.23
  other v2: 407.95,173 407.95,185.05
  other v5: 407.95,130
AN1: J4.2 U6.23 | length 522.7
  Layer 2 w4.92: J4.2 117.13,213.04 135.46,231.37 135.46,283.79 142.99,291.32 204.13,291.32 272.67,222.78 335.38,222.78 346.36,233.76 410.85,233.76 438.99,261.9 438.99,271.55 v1(439.09,271.65)
AN2: J4.3 U6.9 | length 578
  Layer 2 w4.92: J4.3 117.4,156.12 125.48,164.2 125.48,206.08 147.09,227.69 147.09,254.35 154.14,261.4 205.89,261.4 264.19,203.1 343.54,203.1 354.51,214.07 419,214.07 474.82,269.9 v1(474.82,271.3)
AN3: J4.5 U6.10 | length 498.2
  Top Layer w10: J4.5 152.49,241.5 159.58,248.59 v1@159.58,277.51 ; v1(459.65,301) U6.10
  Layer 2 w4.92: v1(159.58,277.95) 203.58,277.95 268.59,212.94 339.46,212.94 350.44,223.92 414.92,223.92 459.65,268.64 v1(459.65,301)
AN4: J4.6 U6.3 | length 672.2
  Layer 3 w4.92: J4.6 145.64,184.58 154.2,176.01 154.2,141.42 193.62,102 246.08,102 320.03,28.05 395.32,28.05 409.42,42.16 409.42,104.92 422.32,117.82 422.32,203.4 412.17,213.55 412.17,239.25 404.37,247.05 v2(359.49,247.05)
AN5: J4.7 U6.24 | length 661.7
  Layer 3 w4.92: J4.7 154.04,127.66 191.05,90.65 243.05,90.65 315.49,18.21 399.4,18.21 419.27,38.08 419.27,100.85 432.16,113.74 432.16,207.48 422.02,217.62 422.02,265.36 439.22,282.56 v2(439.22,301)
CLR_POWER: R1.1 U2.B3 U6.25 | length 79.1
  Layer 2 w4.92: v3(317.64,253.83) 317.64,273.49 v1(335.93,291.77)
  Bottom Layer w3.54: R1.1@309.99,254.2 R1.1 v3(317.64,253.83) ; U2.B3@311.99,278.66 U2.B3@313.26,278.66
  Bottom Layer w7: R1.1@309.99,254.2 U2.B3
ENABLE: U1.B3 U2.B1 U3.3 | length 573.2
  Layer 2 w6: v3@202.21,34.18 222.85,54.82 222.85,119.01 246.43,142.59 316.09,142.59 v4@332.43,126.25
  Layer 3 w4.92: v5@311.85,322.96 240.85,322.96 235.3,317.41 235.3,217.47 256.46,196.32 256.46,166.52 272.94,150.04 327.15,150.04 332.7,144.5 v4(332.7,126.25)
  Bottom Layer w8: v3@201.25,33.92 U1.B3@212.85,33.92
  other v3: 202.21,33.88
  other v5: 309.99,322.82
GND: C1.1 C2.1 C3.1 C4.1 C5.1 C6.2 C7.1 C8.1 C9.1 C10.1 C11.1 C12.1 C13.2 C14.1 J2.1 J3.2 J4.4 J7.5 LED1.3 R3.2 R4.1 R5.2 R8.2 SW1.1 SW1.2 U1.C1 U1.C2 U1.C3 U2.A2 U3.2 U3.5 U4.5 U4.7 U5.B2 U6.1 U6.13 U6.18 U6.26 U8.1 U8.6 U8.7 U9.A5 U9.C1 U9.C5 U9.E1 U9.E3 | length 1100.5
  Top Layer w5: U9.A5 273.23,257.15
  Top Layer w5.91: U9.E3 U9.E1 U9.C1 U9.C5 U9.A5
  Top Layer w6: C11.1@272.98,276.73 C11.1@273.95,277.7 ; C11.1 C11.1@274.08,278.71
  Top Layer w8: U6.26 392.58,284.64 413.46,284.64 419.54,290.72 419.54,311.6 428.14,320.2 428.45,320.2 428.45,329.61 U6.13 ; U6.13@431.67,329.27 431.67,323.9 434.88,320.69
  Top Layer w10: U8.1@298.6,114.31 v2@307.33,114.31
  Layer 2 w4.92: v3(278.67,293.82) 278.94,293.56 278.94,278.92 v1(279.2,278.66) ; v1@296.67,336.43 310.79,322.31 310.79,285.73 303,277.95 279.91,277.95 v1(279.2,278.66) ; v1(300.36,245.91) 299.97,245.52 288.46,245.52 279.2,254.78 v3(279.2,255.92) v1(279.2,278.66)
  Layer 3 w4.92: v3(279.2,255.92) 300.94,255.92 314.85,269.82 v3(335.4,269.82) ; v3(335.4,269.82) 349.33,283.78 v4(387.22,283.78)
  Bottom Layer w3.54: R8.2 429.86,227.01 C8.1 449.14,206.81 461.19,206.81 467.57,213.19 C7.1
  Bottom Layer w4: C2.1@177.36,32.27 177.36,20.51 178.43,19.43 C2.1@181.39,19.43 ; C2.1@179.39,17.43 193.06,17.43
  Bottom Layer w5.91: SW1.2 236.03,301.58 243.26,294.35 278.15,294.35 v3(278.67,293.82) ; v3@279.23,294.38 U2.A2 ; U4.7 422.11,157.99 431.28,148.82 C5.1 ; v3@446.31,173.96 U4.5@458.21,173.96
  Bottom Layer w6: 271.36,371.08 277.67,377.4 277.67,442.22 265.17,454.73 265.17,486.17 271.97,492.98 315.13,492.98 323.34,501.19 323.34,553.19 v4(338.16,568)
  Bottom Layer w10: v5@353.61,133.65 353.61,115.43 353.79,115.26 ; U5.B2 v4(387.22,283.78)
  Bottom Layer w12: C1.1@271.36,338.65 271.36,371.08
  other v1: 220.25,146.17 363.54,164.16 376.11,164.03 363.33,176.38 376.11,176.38 296.5,336.43
  other v2: 310.33,112.31
  other v3: 446.28,173.99
  other v4: 171.36,32.27
  other v5: 350.59,135.62 305.53,136.75 456.22,320.69
GPOUT: R7.1 U5.A1 U6.5 | length 98.2
  Layer 2 w4.92: v1(406.73,252.94) 407.04,253.26 407.04,302.69 v3(407.36,303)
  Bottom Layer w5.91: U5.A1 401.73,316.28 405.19,319.74 422.38,319.74 425.84,316.28 425.84,315.62 428.2,313.26 R7.1
  Bottom Layer w10: U5.A1 v3@406.91,303.51
HV_LED_DATA: LED1.4 R13.1 U7.3
I2C.SCL: R11.1 U5.A3 U6.15 U8.13 U9.A3 | length 541.3
  Top Layer w6: U9.A3 248.49,279.43 252.74,283.68 254.66,283.68 v2(255.78,284.79)
  Layer 3 w4.92: v2(322.33,68.1) 322.33,83.11 363.99,124.77 363.99,146.6 350.71,159.88 277.01,159.88 266.3,170.6 266.3,200.4 245.49,221.21 245.49,274.71 255.57,284.79 v2(255.78,284.79) 257.09,283.47 268.8,283.47 272.98,279.3 296.48,279.3 310.63,293.45 331.16,293.45 345.32,307.6 370.03,307.6 v2(383.11,320.69)
  Layer 3 w6: v5@379.67,335.65 382.61,332.7 v2@382.61,321.18
  Layer 3 w8: v2@382.61,321.18 v2(383.11,320.69)
  Bottom Layer w5: U5.A3 362.36,324.54 372.97,335.15 v5(379.67,335.15)
I2C.SDA: R10.1 U5.A2 U6.14 U8.14 U9.B4 | length 567.1
  Top Layer w6: U9.B4 237.2,268.65 258.22,268.65 v2(258.87,269.3)
  Top Layer w8: U8.14@311.43,88.32 314.32,91.21 326.05,91.21 340.5,105.67 v2(374,105.67)
  Layer 3 w4.92: v2(374,105.67) 374,150.51 354.65,169.87 280.95,169.87 276.14,174.67 276.14,205.12 258.78,222.49 258.78,269.2 v2(258.87,269.3) 300.4,269.3 314.71,283.6 335.23,283.6 348.17,296.54 382.1,296.54 406.25,320.69 v2(406.73,320.69) v2@405.42,322
  Layer 3 w6: v5(398.42,335.15) 405.42,328.15 v2@405.42,322
  Bottom Layer w5: U5.A2 391.72,318.36 391.72,328.43 v5(398.42,335.15)
LED_DATA: R12.1 U6.22 U7.2 | length 94.5
  Layer 3 w4.92: v2(314.72,189.53) 331.25,189.53 338.91,197.19 338.91,251.29 v2(348.12,260.5)
NetC8_2: C8.2 U6.7
  other v4: 461.19,223.55
NetC14_2: C14.2 U5.B3 | length 29.4
  Bottom Layer w5: C14.2 336.26,294.31 357.1,294.31 362.1,289.32 U5.B3@362.36,289.32
NetL1_1: L1.1 U1.B1 U1.B2 | length 94.8
  Layer 2 w14: 271.14,34.32 271.14,93.69 ; 271.14,93.76 v3(271.14,99.69) v3(271.14,113.14)
  Bottom Layer w6: U1.B1 260.4,33.97
  other v3: 270.82,42
NetR3_1: R3.1 U4.2
NetR5_1: R5.1 U4.3
NetR8_1: R8.1 U5.B1 | length 36.1
  Bottom Layer w5: U5.B1 418.86,271.86 427.65,271.86 R8.1
NetSW1_3: SW1.3 SW1.4 U2.A3 | length 171.4
  Bottom Layer w10: 151.38,244.67 151.38,269.75 160.16,278.53 U2.A3@294.1,278.53
NetU6_11: U6.11 U6.12
POWER_DET: R2.1 R4.2 U6.21 | length 8.2
  Top Layer w5: R2.1 249.73,235.35 250.72,235.35 252.55,237.19 R2.1@252.55,238.17 ; v1@296.02,262.13 v1(296.5,262.61)
RST: J7.3 U6.19 | length 286.1
  Layer 2 w6: v1(294.97,319.33) 294.6,319.7 286.27,319.7 271.71,334.26 271.71,371.44 277.67,377.4 277.67,442.22 265.17,454.73 265.17,486.17 271.97,492.98 331.76,492.98 338.16,499.37 v4(338.16,518)
RX: J5.1 U6.20 | length 56.9
  Layer 2 w4.92: v1(257.78,333.51) 296.18,295.11 v1@296.18,292.55
  other v1: 297.5,293.24
SWDCLK: J7.4 U6.16 | length 273.4
  Layer 3 w7: v4(288.16,518) 288.16,497.75 292.93,492.98 351.68,492.98 359.02,485.63 359.02,456.4 350.97,448.34 350.97,372.67 344.3,366 344.3,335.61 359.02,320.89 v2(359.37,320.89)
SWDIO: J7.2 U6.17 | length 200.6
  Layer 2 w6: v4(288.16,468) 305.1,451.06 341.72,451.06 350.48,442.3 350.48,373.7 344.3,367.52 344.3,329.12 v1(335.87,320.69)
TX: J6.1 U6.2 | length 203.6
  Layer 2 w4.92: v1(208.56,333.51) 208.56,300.81 276.75,232.63 329.32,232.63 335.87,239.17 v1(335.87,251.79)
VBAT: C1.2 C2.2 C5.2 C13.1 L1.2 R6.2 U1.A3 U2.A1 U4.6 U5.C2 U5.C3 | length 874.2
  Layer 2 w4.92: v2(192.44,162.59) ccw(c197.35,162.96) 193.38,160.04 cw(c181.38,150.95) 196.44,150.95
  Layer 2 w5: v3(315.79,339.15) 315.79,338.14 322.27,331.66 322.27,312.53 328.93,305.86 366.74,305.86 372.2,300.41 v4(372.2,269.31)
  Layer 3 w4.92: v2(192.44,162.59) 192.44,324.76 201.48,333.8 247.05,333.8 251.9,338.65 315.28,338.65 v3(315.79,339.15)
  Layer 3 w5.91: v4(372.2,269.31) 408.96,269.31 424.17,284.53 424.17,329.62 430.14,335.58 466.14,335.58 472.07,329.65 472.07,282.79 472.03,282.75 472.03,264.17 464.58,256.72 464.58,239.65 474.97,229.26 474.97,183.19 458.24,166.45 v4(458.24,132.38)
  Bottom Layer w5: C13.1 C13.1@338.21,243.96 ; U5.C3 v4(372.2,269.31) U5.C2
  Bottom Layer w10: C13.1@335.61,246.98 360.01,246.98 363.86,243.13 R6.2 ; R6.2@362.36,243.96 U5.C3
  other v3: 196.44,63.7
VBAT#: J1.1 R6.1 U5.C1 | length 188.5
  Layer 3 w10: v5(396.14,74.93) 396.14,108.96 387.6,117.5 387.6,210.22 v5(398.17,220.8)
  Bottom Layer w5: R6.1 R6.1@401.73,235.87
  Bottom Layer w12: R6.1@401.73,235.87 U5.C1
pads on no net: J3.MH J7.6 J7.MP1 J7.MP2 J7.MP3 J7.MP4 J7.MP5 J7.MP6 J7.MP7 LED1.1 U2.B2 U4.4 U6.4 U6.6 U6.27 U6.28 U8.2 U8.3 U8.4 U8.9 U8.10 U8.11 U9.D2 U9.D4

## Polygon pours and split planes (outlines as drawn)
GND on Bottom Layer "GND_L04_P008" (solid, pour order 8): 328.25,8.34 328.25,259 481.96,259 481.96,8.34
VBAT# on Bottom Layer "VBAT#_L04_P020" (solid, pour order 20): 397.2,8 397.2,61.88 382.36,76.73 382.36,83.91 479.96,83.91 479.96,8
GND on Bottom Layer "GND_L04_P019" (solid, pour order 19): 360.89,89.23 390.43,59.68 390.43,8 289.3,8 286.37,10.93 286.37,40.93 321.48,40.93 327.92,47.38 327.92,89.23
GND on Bottom Layer "GND_L04_P004" (solid, pour order 4): 156.45,648.96 469.98,648.96 469.98,366 156.45,366
5V on Layer 3 "5V_L03_P010" (solid, pour order 10): 252.22,158.56 269.36,141.41 293.48,141.41 298.89,135.89 298.89,89.23 168.46,89.41 168.28,89.23 168.28,158.56
GND on Layer 3 "GND_L03_P000" (solid, pour order 0): 0,350.33 483.18,350.33 483.18,3.69 0,3.69
GND on Layer 2 "GND_L02_P018" (solid, pour order 18): 0,354.33 483.18,354.33 483.18,0 0,0
3V on Layer 2 "3V_L02_P015" (solid, pour order 15): 341.25,188.47 339.98,187.2 328.88,187.2 324.94,191.15 324.94,195.29 278.25,195.29 240.26,233.27 211.81,233.27 211.81,168.89 229.75,150.95 317.44,150.95 344.6,123.56 359.19,123.56 359.19,170.53
VBAT on Layer 2 "VBAT_L02_P014" (solid, pour order 14): 211.81,233.13 211.81,178.71 222.85,167.89 222.85,40.88 168.73,40.88 168.73,233.13
3V on Layer 2 "3V_L02_P013" (solid, pour order 13): 284.99,141.41 284.99,7.53 284.39,6.93 283.36,7.97 212.89,7.97 212.89,129.27 225.03,141.41
GND on Top Layer "GND_L01_P017" (solid, pour order 17): 0,354.33 483.18,354.33 483.18,0 0,0

## Other copper
Top Layer:
  rectangle net RX: 288.93,280.33 318.15,299.08
  rectangle net GND: 380.16,277.06 401.81,292.14
  rectangle net GND: 268.12,272.7 279.93,284.5
  rectangle net LED_DATA: 342.16,260.5 354.08,280.33
  rectangle net 3V: 187.14,10.96 241.43,34.98
  rectangle net 3V: 471.67,230.13 484.65,251.83
  rectangle net NetC8_2: 443.61,220.85 459.97,251.79
  rectangle net GND: 424.45,316.2 438.88,342.34
  rectangle net LED_DATA: 329.96,266.29 351.62,280.33
  rectangle net GND: 293.57,230.13 318.15,252.34
  rectangle net 3V: 187.14,81.42 263.64,95.21
  rectangle net LED_DATA: 299.04,152.27 321.61,208.46
  rectangle net HV_LED_DATA: 262.77,168.69 288.31,179.32
  rectangle net GND: 424.45,320.69 438.88,342.34
  rectangle net GND: 330.23,155.83 382.7,208.58
  rectangle net RST: 288.93,303.95 318.21,325.29
  rectangle net 3V: 237.33,296.45 280.01,316.22
  rectangle net GND: 269.63,254.64 276.05,275.8
  rectangle net POWER_DET: 280.76,256.71 296.5,268.52
  rectangle net POWER_DET: 280.77,243.91 287.03,263.64
  rectangle net POWER_DET: 244.43,244 283.01,249.31